# Altium PCB IoT_SYNTHPATCH.PcbDoc (part 2 of 3)
Units mm, origin at the board's own origin, x right, y up, seen from the top; angles counter-clockwise.
Board outline 109 x 108 mm, 6 copper layers (Top Layer, PWR, GND, SIG_MID, GND2, Bottom Layer), stack 1.82 mm thick; 198 components, 158 nets, 695 pads, 418 vias.
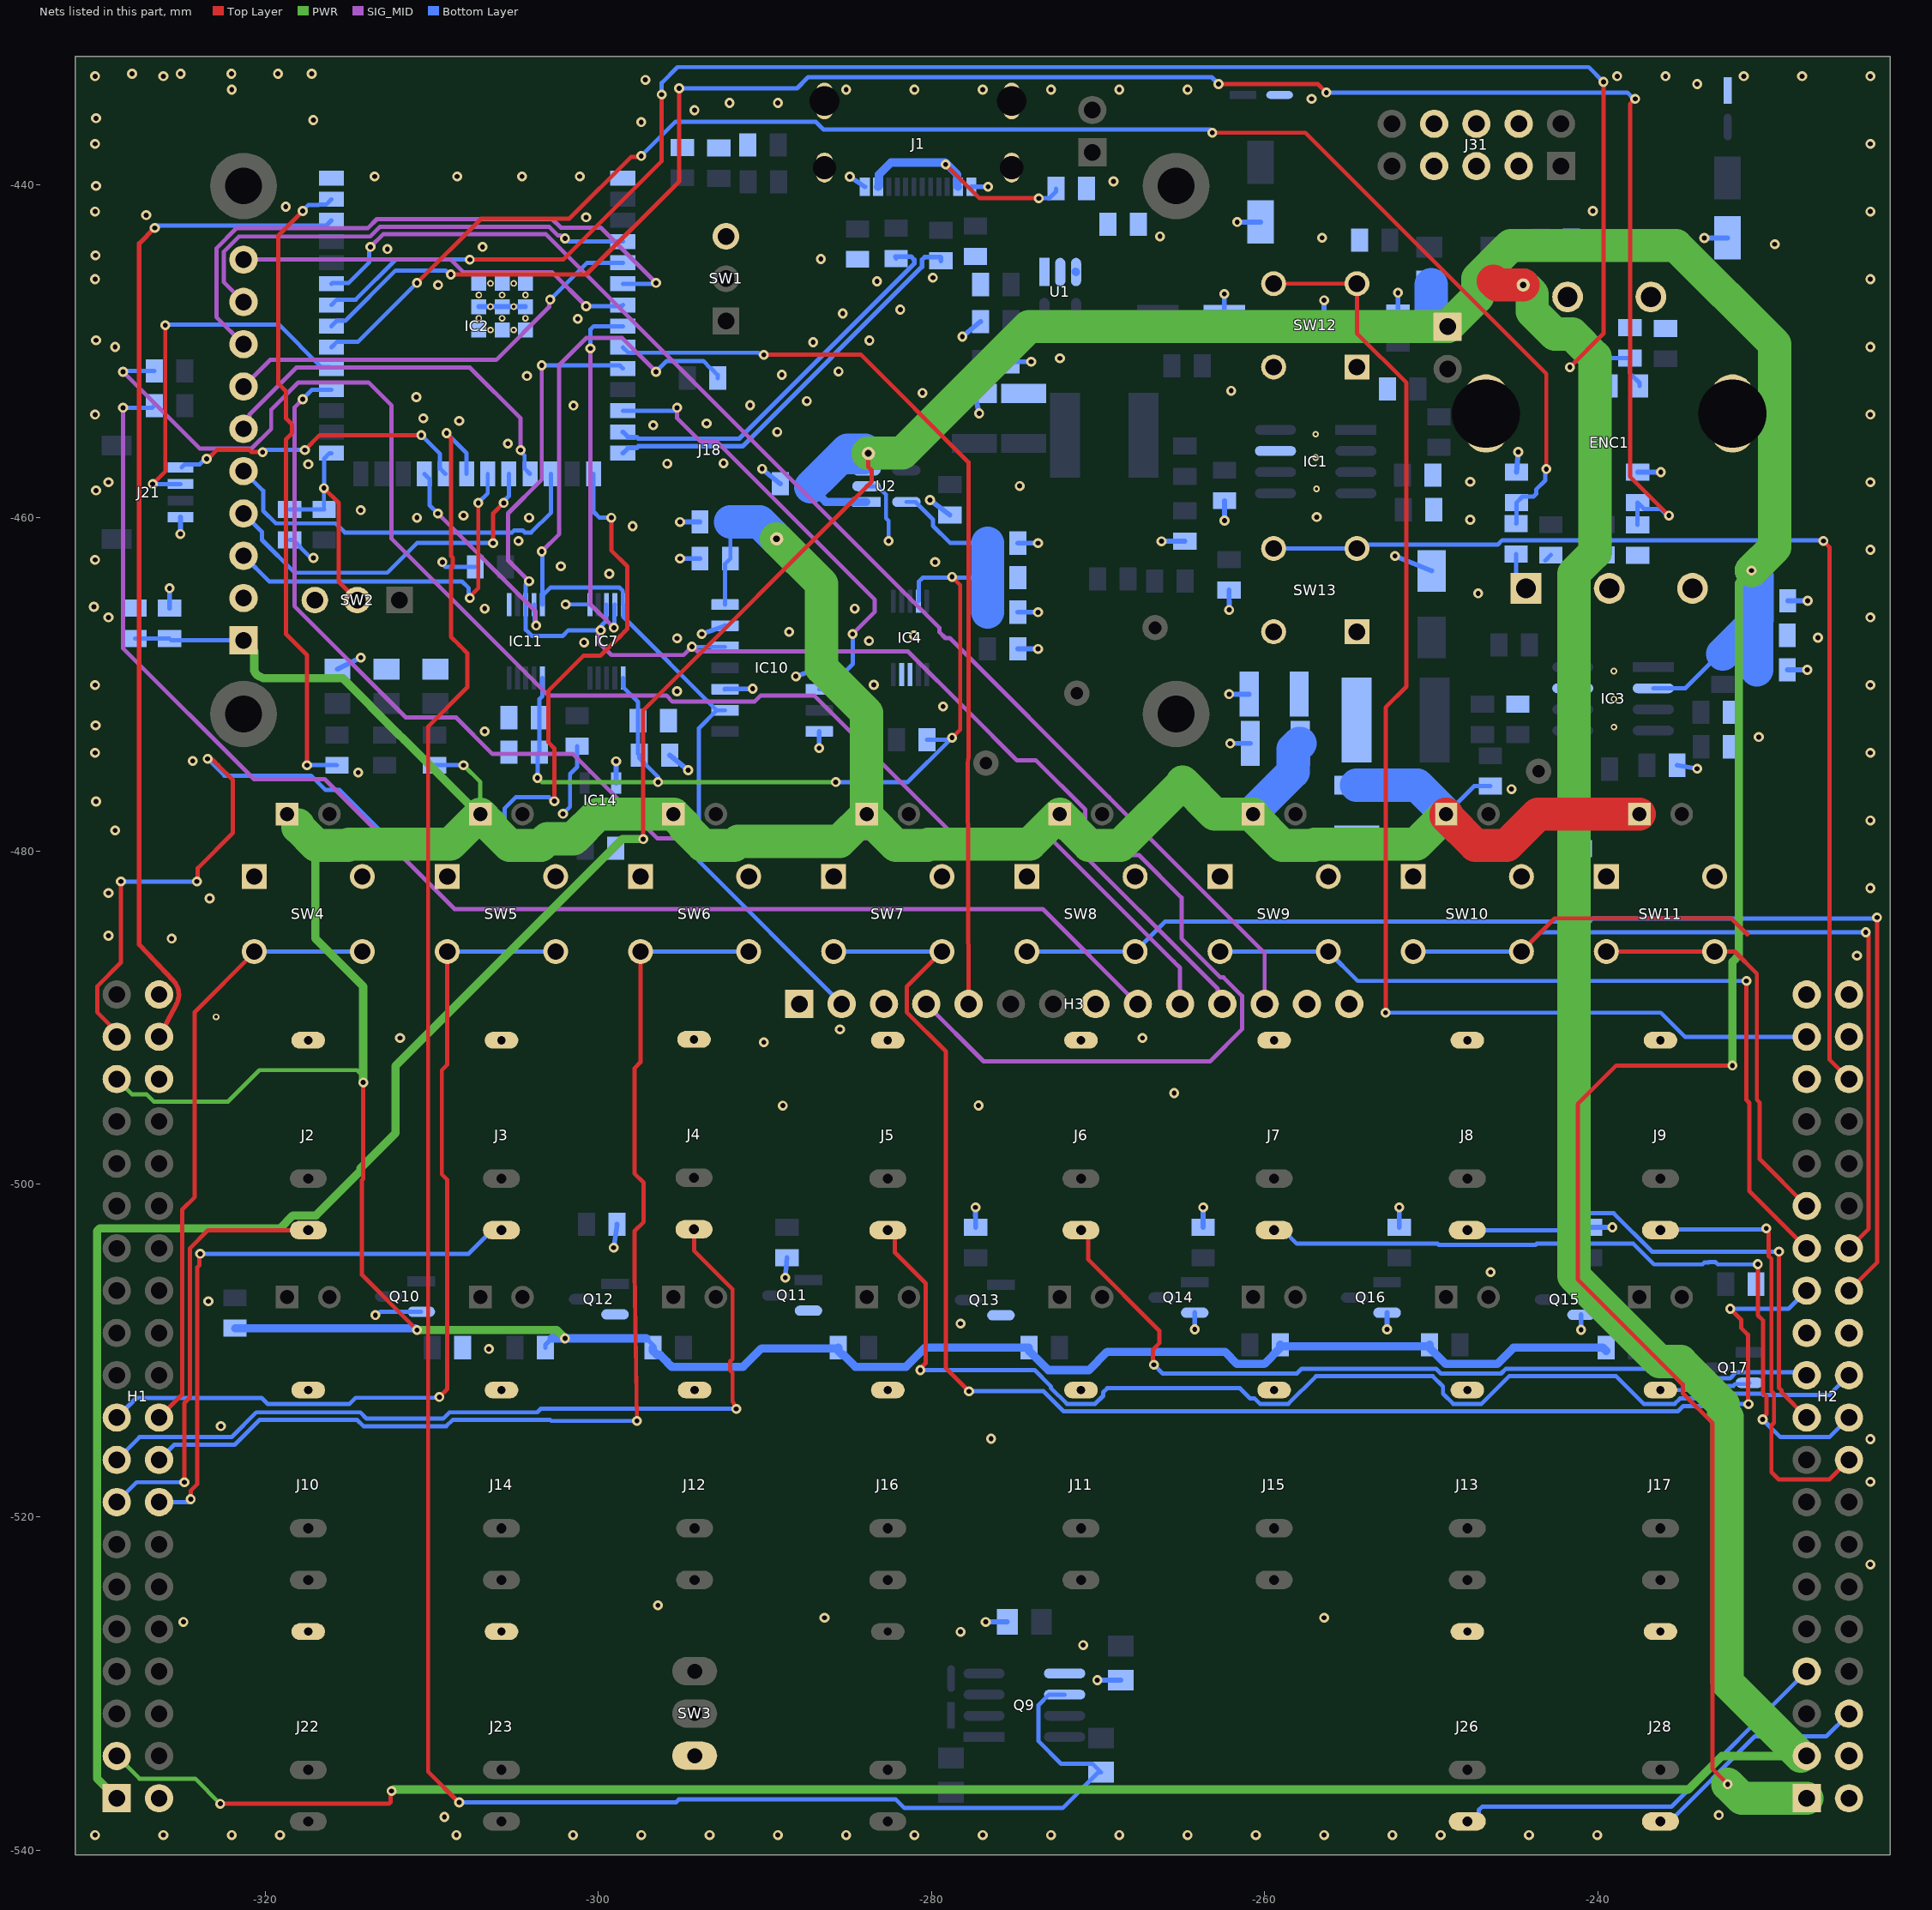
[diagram p6: the nets of this part, all layers, seen from the top]

## Via types
v1: diameter 0.6, hole 0.3, Top Layer to Bottom Layer, 407 vias
v2: diameter 0.4, hole 0.2, Top Layer to Bottom Layer, 7 vias
v3: diameter 0.8, hole 0.4, Top Layer to Bottom Layer, 4 vias

## Nets (pads, with @x,y where several pads share a name; then routed paths per layer and width w, separated by ;. In a path a pad name is that pad's centre, name@x,y a point inside that pad or via, vN(x,y) a via of type N, cw(c..) or ccw(c..) an arc to the next point about the centre after c; other vN are vias at no path point) (continued)
+5: C22.2 C23.2 C24.2 C62.2 C63.2 C88.2 C89.2 DS4.1 DS5.1 DS6.1 DS7.1 DS8.1 DS9.1 DS10.1 DS11.1 H1.35 IC10.14 J18.1 L2.2 R10.1 R16.1 R92.1 R93.1 R98.1 R99.1 R104.1 R105.1 R110.1 R111.1 | length 305
  Top Layer w0.254: v1(-314.123,-493.903) -314.123,-499.691 -314.198,-499.766 -314.198,-505.46 v1(-310.896,-508.762)
  Top Layer w2: DS10.1@-249.093,-477.791 -249.093,-477.908 -247.331,-479.67 -245.458,-479.67 -243.579,-477.791 DS11.1@-237.493,-477.791
  PWR w0.254: H1.35@-328.923,-493.701 -328.014,-494.61 -327.139,-494.61 -326.703,-495.046 -322.24,-495.046 -320.358,-493.164 -314.488,-493.164 -314.189,-493.462 ; J18.1@-321.31,-467.36 J18.1@-320.667,-468.003 ; DS4.1@-318.693,-477.791 -318.032,-478.452 -317.973,-478.511 ; -312.031,-472.954 -312.031,-472.853 ; -311.664,-473.321 -311.563,-473.321 ; v1(-308.102,-474.853) -307.093,-475.862 DS5.1@-307.093,-477.791
  PWR w0.5: J18.1@-320.667,-468.003 -320.667,-469.06 -320.667,-469.192 -320.602,-469.306 ccw(c-320.167,-469.06) -320.363,-469.52 cw(c-321.31,-471.78) -320.121,-469.638 -315.347,-469.638 -312.031,-472.954 -311.664,-473.321 -307.194,-477.791 DS5.1@-307.093,-477.791 ; -316.814,-479.67 -316.997,-479.853 -316.997,-485.262 -314.123,-488.136 -314.123,-493.462 v1(-314.123,-493.903) ; v1(-310.896,-508.762) -302.514,-508.762 v1(-302.006,-509.27)
  PWR w2: -318.032,-478.452 -318.032,-478.569 -316.931,-479.67 -316.814,-479.67 -315.058,-479.67 -314.98,-479.592 -308.894,-479.592 DS5.1@-307.093,-477.791 -306.432,-478.452 -306.432,-478.569 -305.331,-479.67 -303.458,-479.67 -303.062,-479.274 -301.512,-479.274 -300.029,-477.791 DS6.1@-295.493,-477.791 -294.832,-478.452 -294.832,-478.569 -293.731,-479.67 -291.858,-479.67 -291.613,-479.425 -285.527,-479.425 DS7.1@-283.893,-477.791 ; v3(-289.306,-461.264) -286.6,-463.97 -286.6,-469.013 -283.893,-471.719 DS7.1@-283.893,-477.791 ; DS10.1@-249.093,-477.791 -250.894,-479.592 -256.98,-479.592 -257.058,-479.67 -258.931,-479.67 -260.693,-477.908 DS9.1@-260.693,-477.791 -263,-477.791 -264.922,-475.869 -264.922,-475.934 -268.658,-479.67 -270.531,-479.67 -271.632,-478.569 -271.632,-478.452 DS8.1@-272.293,-477.791 -274.094,-479.592 -280.18,-479.592 -280.258,-479.67 -282.131,-479.67 -283.893,-477.908 DS7.1@-283.893,-477.791
  Bottom Layer w0.254: C89.2@-327.829,-467.257 C88.2@-325.755,-467.257 -325.652,-467.36 J18.1@-321.31,-467.36 ; v1@-310.999,-508.659 v1(-310.896,-508.762) ; R10.1@-309.837,-474.859 -309.831,-474.853 v1(-308.102,-474.853) ; R98.1@-303.184,-509.825 -303.184,-509.656 R98.1@-302.798,-509.27 ; R93.1@-297.114,-509.27 -296.728,-509.656 R93.1@-296.728,-509.825 ; IC10.14@-292.393,-465.211 -292.393,-462.765 C63.2@-292.076,-462.449 C62.2@-292.076,-460.248 ; R104.1@-274.148,-510.012 R104.1@-274.148,-509.825 ; DS10.1@-249.093,-477.791 -247.417,-476.115 R16.1@-246.438,-476.115
  Bottom Layer w0.5: R92.1@-321.818,-508.659 v1@-310.999,-508.659 ; R98.1@-302.798,-509.27 v1(-302.006,-509.27) R93.1@-297.114,-509.27 ; R93.1@-296.728,-509.825 -296.728,-510.012 -296.466,-510.275 -296.278,-510.275 -295.866,-510.687 -295.866,-510.711 -295.602,-510.975 -291.306,-510.975 -290.197,-509.866 -285.644,-509.866 R99.1@-285.603,-509.825 -285.603,-510.012 -285.341,-510.275 -285.267,-510.275 -284.567,-510.975 -281.536,-510.975 -280.386,-509.825 R104.1@-274.148,-509.825 ; R104.1@-274.148,-510.012 -272.985,-511.175 -270.547,-511.175 -269.445,-510.073 -262.379,-510.073 -261.651,-510.801 -260.019,-510.801 -259.056,-509.838 R110.1@-259.056,-509.651 -258.97,-509.738 -250.173,-509.738 R105.1@-250.086,-509.651 -250.086,-509.838 -249.124,-510.801 -246.032,-510.801 -245.056,-509.825 -239.678,-509.825 R111.1@-239.49,-510.012
  Bottom Layer w2: C62.2@-292.076,-460.248 -290.322,-460.248 v3(-289.306,-461.264) ; DS9.1@-260.693,-477.791 -260.693,-477.674 -258.285,-475.266 -258.285,-473.897 -257.935,-473.547 C23.2@-257.86,-473.547 ; C24.2@-254.465,-476.053 -250.831,-476.053 DS10.1@-249.093,-477.791
+5_USB: C2.2 C3.2 J1.A4-B9 J1.B4-A9 U1.1 U1.3 | length 15.7
  Top Layer w0.254: v1(-279.146,-438.785) -277.114,-440.817 v1(-273.558,-440.817)
  Bottom Layer w0.254: v1(-273.558,-440.817) -273.11,-440.817 -273.099,-440.806 -272.911,-440.806 -272.526,-440.42 C3.2@-272.526,-440.233
  Bottom Layer w0.5: J1.A4-B9@-283.205,-440.126 -283.155,-440.076 -283.155,-439.389 -282.437,-438.672 v1@-279.172,-438.672 ; J1.B4-A9@-278.405,-440.126 -278.455,-440.076 -278.455,-439.389 ; U1.3@-271.342,-445.222 U1.3@-271.32,-445.244 ; v1@-279.172,-438.672 -278.455,-439.389 ; v1@-279.172,-438.672 -278.455,-439.389
+5A: C28.2 C29.2 C37.2 C38.2 C41.2 C42.2 C91.2 IC4.9 IC7.1 IC11.1 R19.2 U2.5 | length 66.5
  Top Layer w0.254: v1(-278.765,-473.202) -278.276,-472.713 -278.276,-464.039 v1(-278.765,-463.55)
  PWR w0.254: v1(-303.657,-475.615) -303.403,-475.869 v1(-296.418,-475.869) v1(-285.75,-475.869)
  Bottom Layer w0.254: v1(-303.657,-475.615) -303.657,-474.181 C41.2@-303.55,-474.074 -303.538,-474.062 C42.2@-303.538,-472 -303.538,-470.884 -303.364,-470.71 IC11.1@-303.364,-469.616 ; IC7.1@-298.514,-469.616 -298.514,-470.166 -297.619,-471.061 C37.2@-297.619,-472.177 -297.619,-474.172 C38.2@-297.54,-474.251 -297.54,-474.439 -296.418,-475.561 v1(-296.418,-475.869) ; v1(-285.75,-475.869) -281.432,-475.869 v1@-278.892,-473.329 ; U2.5@-281.507,-459.048 -280.962,-459.048 -279.917,-460.093 -279.917,-460.477 -278.876,-461.518 C91.2@-276.63,-461.518 ; IC4.9@-280.787,-465.015 -280.764,-464.992 -280.764,-464.18 -280.764,-463.835 -280.521,-463.592 -278.765,-463.592 C28.2@-276.63,-463.592 ; R19.2@-280.265,-473.329 v1@-278.892,-473.329 ; v1(-278.765,-473.202) v1@-278.892,-473.329
  Bottom Layer w2: C29.2@-276.63,-465.667 C28.2@-276.63,-463.592 C91.2@-276.63,-461.518
+12: C19.2 C20.2 C21.2 C90.2 FB2.1 H1.1 H2.1 IC3.2 J24.1 R14.2 R116.1 U2.1 U2.3 | length 306.2
  Top Layer w0.254: v1(-297.307,-479.291) -297.307,-471.553 -283.591,-457.837 -283.591,-457.158 -283.791,-456.958 v3(-283.791,-456.13) ; v1(-232.184,-536.039) -233.096,-535.127 -233.096,-514.356 -234.888,-512.564 -234.888,-512.027 -241.195,-505.72 -241.195,-495.2 -238.881,-492.887 v1(-231.902,-492.887)
  PWR w0.5: H1.1@-328.923,-536.881 -330.1,-535.704 -330.1,-502.815 -329.951,-502.666 -319.118,-502.666 -318.342,-501.89 -316.96,-501.89 -314.296,-499.226 -314.296,-499.061 -312.19,-496.955 -312.19,-492.911 -298.57,-479.291 v1(-297.307,-479.291) ; v1(-231.902,-492.887) -231.902,-486.666 -231.521,-486.285 -231.521,-463.931 v1(-230.759,-463.169)
  PWR w2: v3(-283.791,-456.13) -283.779,-456.118 -281.747,-456.118 -274.15,-448.521 J24.1@-249.004,-448.521 -247.195,-446.712 -247.195,-445.633 -245.211,-443.649 -235.293,-443.649 -229.362,-449.58 -229.362,-461.772 v1(-230.759,-463.169) ; v1(-232.184,-536.039) -231.342,-536.881 H2.1@-227.443,-536.881
  Bottom Layer w0.254: R116.1@-298.967,-479.839 -298.967,-479.677 -298.582,-479.291 v1(-297.307,-479.291) ; IC3.2@-236.656,-470.238 -234.734,-470.238 -232.666,-468.17 R14.2@-232.479,-468.17
  Bottom Layer w0.5: C90.2@-287.25,-458.15 -286.352,-459.048 U2.1@-283.909,-459.048 ; C90.2@-287.25,-457.774 -286.624,-457.148 U2.3@-283.909,-457.148
  Bottom Layer w2: C90.2@-287.25,-458.15 -286.436,-457.336 -285.031,-455.93 -283.991,-455.93 v3(-283.791,-456.13) ; FB2.1@-250,-446.001 -250,-447.524 J24.1@-249.004,-448.521 ; R14.2@-232.479,-468.17 -230.409,-466.101 ; v1(-230.759,-463.169) -230.409,-463.519 C21.2@-230.409,-464.98 -230.409,-466.101 ; C19.2@-230.435,-469.134 -230.435,-466.126 -230.409,-466.101
-12: FB1.1 H1.3 H2.3 | length 205.6
  Top Layer w0.254: v1(-322.707,-537.21) -312.569,-537.21 -312.486,-537.127 -312.486,-536.514 v1(-312.42,-536.448)
  Top Layer w2: -246.259,-445.799 -246.034,-446.024 v3(-244.475,-446.024)
  PWR w0.254: H1.3@-328.923,-534.341 -327.56,-535.704 -324.213,-535.704 v1(-322.707,-537.21)
  PWR w0.5: v1(-312.42,-536.448) -312.393,-536.448 -312.3,-536.355 -234.551,-536.355 -232.537,-534.341 -227.803,-534.341 H2.3@-227.443,-534.341
  PWR w2: v3(-244.475,-446.024) -243.926,-446.573 -243.926,-447.616 -242.566,-448.977 -241.522,-448.977 -240.162,-450.337 -240.162,-462.092 -241.426,-463.356 -241.426,-505.515 -236.274,-510.667 -235.013,-510.667 -232.442,-513.238 -232.442,-513.775 -232.223,-513.994 -232.223,-529.921 H2.3@-227.803,-534.341
  Bottom Layer w0.254: FB1.1@-246.259,-445.799 -244.848,-445.799 -244.623,-446.024 v3(-244.475,-446.024)
BOOT: C15.2 IC2.27 R76.1 SW2.2 | length 13.3
  Top Layer w0.254: v1(-316.484,-458.216) -315.595,-459.105 -315.595,-463.832 SW2.2@-314.485,-464.942
  Bottom Layer w0.254: C15.2@-318.54,-459.492 R76.1@-316.469,-459.492 ; v1(-316.484,-458.216) -316.484,-459.478 R76.1@-316.466,-459.496 ; v1@-316.466,-458.234 -316.466,-456.438 -316.143,-456.115 IC2.27@-316.034,-456.115
D0_L: H1.20 SW4.3 SW4.4 | length 36.8
  Top Layer w0.254: H1.20@-326.383,-514.021 -324.993,-512.631 -324.993,-501.531 -324.239,-500.777 -324.239,-489.677 -320.673,-486.111 SW4.3@-320.673,-486.041
  Bottom Layer w0.254: SW4.3@-320.673,-486.041 SW4.4@-314.173,-486.041
D0_M: H2.37 SW12.3 SW12.4 | length 76.4
  Top Layer w0.254: SW12.4@-259.454,-445.945 SW12.3@-254.454,-445.945 -254.454,-448.921 -251.476,-451.899 -251.476,-470.132 -252.73,-471.386 v1(-252.73,-489.712)
  Bottom Layer w0.254: v1(-252.73,-489.712) -236.203,-489.712 -234.754,-491.161 H2.37@-227.443,-491.161
D1_L: H1.19 SW5.3 SW5.4 | length 53.9
  Top Layer w0.254: v1(-309.553,-512.787) -309.553,-512.783 -309.073,-512.304 -309.073,-499.746 -309.404,-499.414 -309.404,-493.168 -309.073,-492.837 SW5.3@-309.073,-486.041
  Bottom Layer w0.254: H1.19@-328.923,-514.021 -327.746,-512.844 -320.225,-512.844 -319.867,-513.202 -314.947,-513.202 -314.579,-512.834 -309.599,-512.834 v1(-309.553,-512.787) ; SW5.3@-309.073,-486.041 SW5.4@-302.573,-486.041
D1_M: H2.36 SW13.3 SW13.4 | length 66.2
  Top Layer w0.254: v1(-226.441,-461.391) -226.08,-461.752 -226.08,-492.524 H2.36@-224.903,-493.701
  Bottom Layer w0.254: SW13.4@-259.454,-461.845 SW13.3@-254.454,-461.845 -254.219,-461.61 -245.99,-461.61 -245.724,-461.345 -226.487,-461.345 v1(-226.441,-461.391)
D2_L: H1.18 SW6.3 SW6.4 | length 65.3
  Top Layer w0.254: v1(-297.688,-514.223) -297.84,-505.19 -297.84,-505.186 -297.84,-502.834 -297.281,-502.275 -297.281,-499.92 -297.84,-499.362 -297.84,-493.053 -297.473,-492.686 SW6.3@-297.473,-486.041
  Bottom Layer w0.254: H1.18@-326.383,-516.561 -325.474,-515.652 -321.846,-515.652 -320.358,-514.164 -314.488,-514.164 -314.11,-514.542 -309.136,-514.542 -308.758,-514.164 -302.888,-514.164 -302.829,-514.223 v1(-297.688,-514.223) ; SW6.3@-297.473,-486.041 SW6.4@-290.973,-486.041
D3_L: H2.25 SW7.3 SW7.4 | length 94
  Top Layer w0.254: SW7.4@-279.373,-486.041 -281.49,-488.158 -281.49,-489.679 -279.136,-492.033 -279.136,-511.058 v1(-277.749,-512.445) ; v1(-232.029,-507.492) -231.386,-508.135 -231.386,-508.641 -231.14,-508.887 -230.967,-509.06 -230.967,-513.189 v1(-230.942,-513.213)
  Bottom Layer w0.254: SW7.3@-285.873,-486.041 SW7.4@-279.373,-486.041 ; v1(-277.749,-512.445) -273.27,-512.445 -272.059,-513.656 -235.187,-513.656 -234.865,-513.334 -231.75,-513.334 -231.629,-513.213 v1(-230.942,-513.213) ; v1(-232.029,-507.492) -228.534,-507.492 H2.25@-227.443,-506.401
D4_L: H2.26 SW8.3 SW8.4 | length 75
  Top Layer w0.254: H2.26@-224.903,-506.401 -223.223,-504.72 v1(-223.223,-483.997)
  Bottom Layer w0.254: SW8.3@-274.273,-486.041 SW8.4@-267.773,-486.041 -265.983,-484.251 -240.489,-484.251 -240.295,-484.057 -223.283,-484.057 v1(-223.223,-483.997)
D5_L: H2.27 SW9.3 SW9.4 | length 49.9
  Top Layer w0.254: v1(-231.063,-487.807) -231.063,-494.956 -230.886,-495.133 -230.886,-500.418 H2.27@-227.443,-503.861
  Bottom Layer w0.254: SW9.3@-262.673,-486.041 SW9.4@-256.173,-486.041 -254.407,-487.807 v1(-231.063,-487.807)
D6_L: H2.28 SW10.3 SW10.4 | length 62
  Top Layer w0.254: SW10.4@-244.573,-486.041 -242.58,-484.048 -231.974,-484.048 -231.013,-485.008 -230.999,-484.994 ; H2.28@-224.903,-503.861 -223.726,-502.684 -223.726,-485.061 v1(-223.901,-484.886)
  Bottom Layer w0.254: SW10.3@-251.073,-486.041 SW10.4@-244.573,-486.041 -243.418,-484.886 v1(-223.901,-484.886)
D7_L: H2.29 SW11.3 SW11.4 | length 24.8
  Top Layer w0.254: SW11.3@-239.473,-486.041 SW11.4@-232.973,-486.041 -231.765,-486.041 -230.436,-487.37 -230.436,-494.941 -230.259,-495.118 -230.259,-498.505 H2.29@-227.443,-501.321
D_N: IC2.13 R78.1 | length 23.6
  Bottom Layer w0.28: IC2.13@-298.534,-454.845 -298.224,-455.155 -297.7,-455.155 -297.605,-455.25 -291.541,-455.25 -281.035,-444.744 -281.035,-444.512 -281.23,-444.317 -282.176,-444.317 R78.1@-282.125,-444.429
D_P: IC2.14 R77.1 | length 24.4
  Bottom Layer w0.28: IC2.14@-298.534,-456.115 -298.224,-455.805 -297.7,-455.805 -297.605,-455.71 -291.35,-455.71 -280.575,-444.935 -280.575,-444.512 -280.411,-444.348 -279.465,-444.348 R77.1@-279.433,-444.38
  Bottom Layer w0.3: R77.1@-279.433,-444.569 R77.1@-279.433,-444.38
ENC_A: ENC1.A R117.1 R119.2 | length 2.8
  Bottom Layer w0.254: R119.2@-244.889,-462.184 -244.889,-463.648 ENC1.A@-244.301,-464.236 ; R117.1@-243.144,-462.568 R117.1@-242.815,-462.239
ENC_B: ENC1.B R121.1 R122.2
ENC_SW: ENC1.E R118.1 R120.2
GATE_J2: H1.15 J2.1 | length 26.3
  Top Layer w0.254: v1(-324.866,-517.906) -324.866,-513.146 -324.539,-512.819 -324.539,-503.865 -323.445,-502.771 J2.1@-317.423,-502.771
  Bottom Layer w0.254: H1.15@-328.923,-519.101 -327.728,-517.906 v1(-324.866,-517.906) ; J2.1@-317.434,-502.782 J2.1@-317.423,-502.771
GATE_J3: H1.16 J3.1 | length 35.6
  Top Layer w0.254: v1(-324.485,-518.922) -324.485,-518.412 -324.085,-518.012 -324.085,-504.998 -323.958,-504.871 -323.958,-504.236 v1(-323.912,-504.19)
  Bottom Layer w0.254: H1.16@-326.383,-519.101 -324.664,-519.101 v1(-324.485,-518.922) ; v1(-323.912,-504.19) -307.796,-504.19 -306.377,-502.771 J3.1@-305.823,-502.771
GATE_J4: H1.17 J4.1 | length 50.7
  Top Layer w0.254: J4.1@-294.259,-502.718 -294.259,-504.004 -291.947,-506.316 -291.947,-510.516 -292.092,-510.661 -292.092,-511.181 -291.947,-511.326 -291.947,-513.03 v1(-291.723,-513.499)
  Bottom Layer w0.254: H1.17@-328.923,-516.561 -327.56,-515.198 -322.034,-515.198 -320.547,-513.71 -314.299,-513.71 -313.921,-514.088 -309.325,-514.088 -308.946,-513.71 -303.677,-513.71 -303.466,-513.499 v1(-291.723,-513.499)
GATE_J5: H2.22 J5.1 | length 70.9
  Top Layer w0.254: J5.1@-282.623,-502.771 -282.59,-502.771 -282.196,-503.166 -282.196,-504.117 -280.347,-505.966 -280.347,-510.752 -280.673,-511.078 v1(-280.673,-511.172)
  Bottom Layer w0.254: v1(-280.673,-511.172) -273.804,-511.172 -272.838,-512.139 -272.838,-512.236 -271.871,-513.202 -270.175,-513.202 -269.688,-512.715 -269.688,-512.501 -269.451,-512.264 -261.472,-512.264 -260.856,-512.88 -260.593,-512.88 -260.271,-513.202 -258.575,-513.202 -256.913,-511.54 -249.894,-511.54 -249.283,-512.151 -249.283,-512.591 -248.671,-513.202 -246.975,-513.202 -245.313,-511.54 -238.887,-511.54 -237.225,-513.202 -235.375,-513.202 -235.053,-512.88 -233.984,-512.88 -233.691,-512.586 -230.117,-512.586 -230.045,-512.658 -226.08,-512.658 H2.22@-224.903,-511.481
GATE_J6: H2.21 J6.1 | length 50.5
  Top Layer w0.254: J6.1@-271.023,-502.771 -270.99,-502.771 -270.596,-503.166 -270.596,-504.525 -266.319,-508.802 -266.319,-509.561 -266.7,-509.942 -266.7,-510.794 v1(-266.642,-510.852)
  Bottom Layer w0.254: v1(-266.642,-510.852) -266.116,-511.378 -258.057,-511.378 -257.765,-511.086 -249.706,-511.086 -249.414,-511.378 -245.793,-511.378 -245.501,-511.086 -235.829,-511.086 -235.252,-511.662 -232.033,-511.662 -231.667,-511.297 -227.628,-511.297 H2.21@-227.443,-511.481
GATE_J7: H2.20 J7.1 | length 45.8
  Top Layer w0.254: v1(-230.378,-504.812) -230.378,-507.875 -230.059,-508.194 -230.059,-512.568 -229.861,-512.766 -229.861,-513.812 -230.088,-514.039 v1(-230.088,-514.132)
  Bottom Layer w0.254: J7.1@-259.423,-502.771 -258.869,-502.771 -258.055,-503.585 -249.605,-503.585 -249.537,-503.652 -243.728,-503.652 -243.661,-503.585 -237.851,-503.585 -236.611,-504.825 -233.704,-504.825 -233.585,-504.706 -233.324,-504.706 -233.301,-504.684 -232.925,-504.684 -232.784,-504.825 -230.391,-504.825 v1(-230.378,-504.812) ; v1(-230.088,-514.132) -229.022,-515.198 -226.08,-515.198 H2.20@-224.903,-514.021
GATE_J8: H2.19 J8.1 | length 31.5
  Top Layer w0.254: J8.1@-247.823,-502.771 -247.791,-502.771 J8.1@-247.396,-503.166 ; v1(-229.108,-504.063) -229.108,-512.235 -228.953,-512.39 -228.953,-512.511 H2.19@-227.443,-514.021
  Bottom Layer w0.254: J8.1@-247.823,-502.771 -241.918,-502.771 -241.584,-502.437 -241.584,-502.094 -241.251,-501.76 -239.034,-501.76 -236.731,-504.063 v1(-229.108,-504.063)
GATE_J9: H2.18 J9.1 | length 26.6
  Top Layer w0.254: v1(-229.87,-502.666) -229.87,-502.76 -229.735,-502.895 -229.735,-504.323 -229.562,-504.496 -229.562,-512.423 -229.407,-512.578 -229.407,-514.339 -229.562,-514.493 -229.562,-517.304 -229.128,-517.738 -226.08,-517.738 H2.18@-224.903,-516.561
  Bottom Layer w0.254: J9.1@-236.223,-502.771 -236.171,-502.718 -229.922,-502.718 v1(-229.87,-502.666)
GND: C2.1 C3.1 C4.1 C5.1 C6.1 C7.1 C8.1 C9.1 C10.1 C11.1 C13.1 C14.2 C15.1 C16.1 C17.1 C19.1 C20.1 C21.1 C22.1 C23.1 C24.1 C26.1 C27.1 C28.1 C29.1 C37.1 C38.1 C39.1 C40.1 C41.1 C42.1 C43.1 C61.1 C62.1 C63.1 C64.1 C65.1 C66.1 C82.2 C83.1 C84.1 C85.2 C86.2 C88.1 C89.1 C90.1 C91.1 C92.1 D1.2 D2.2 D14.1 D15.2 DS1.2 DS2.2 DS3.2 ENC1.1 ENC1.2 ENC1.C ENC1.D H1.2 H1.36 H1.40 H2.2 H2.4 H2.23 H2.24 H2.35 H2.38 H2.39 H2.40 H3.1 H3.3 H3.8 H3.13 H3.14 IC1.7 IC2.GND IC3.7 IC4.3 IC4.4 IC7.6 IC10.1 IC10.2 IC10.4 IC10.7 IC10.10 IC10.13 IC11.6 IC14.2 J1.1 J1.2 J1.3 J1.4 J1.A1-B12 J1.B1-A12 J2.3 J3.3 J4.3 J5.3 J6.3 J7.3 J8.3 J9.3 J10.3 J11.3 J12.3 J13.3 J14.3 J15.3 J16.3 J17.3 J18.2 J21.1 J22.3 J23.3 J26.3 J28.3 J31.3 J31.4 J31.5 J31.6 J31.7 J31.8 Q9.5 Q10.2 Q11.2 Q12.2 Q13.2 Q14.2 Q15.2 Q16.2 Q17.2 R5.1 R6.1 R8.1 R9.1 R13.1 R17.1 R18.1 R79.1 R91.1 R94.2 R95.2 R100.2 R101.2 R106.2 R107.2 R112.2 R113.2 SW1.3 SW2.3 SW3.3 SW4.1 SW4.2 SW5.1 SW5.2 SW6.1 SW6.2 SW7.1 SW7.2 SW8.1 SW8.2 SW9.1 SW9.2 SW10.1 SW10.2 SW11.1 SW11.2 SW12.1 SW12.2 SW13.1 SW13.2 U1.2 U2.2 | length 87.2
  Bottom Layer w0.254: C15.1@-318.54,-461.317 -318.353,-461.317 -317.329,-462.341 -317.177,-462.341 v1(-317.111,-462.407) ; v1(-313.397,-507.873) -313.303,-507.873 -313.099,-507.668 Q10.2@-310.64,-507.668 ; v1(-309.372,-462.661) -309.339,-462.694 -309.339,-462.799 -309.19,-462.948 C43.1@-307.396,-462.948 ; v1(-302.133,-477.774) -301.705,-477.346 -301.705,-475.385 -301.277,-474.957 C39.1@-301.277,-473.716 ; v1(-301.967,-465.201) -300.53,-465.201 IC7.6@-300.514,-465.216 ; U2.2@-283.909,-458.098 -283.265,-458.098 -282.992,-458.371 -282.962,-458.371 -282.728,-458.605 -282.728,-460.02 -282.575,-460.173 v1(-282.575,-461.391) ; J17.3@-236.223,-512.371 -234.117,-512.371 -233.863,-512.116 -231.845,-512.116 -231.737,-512.008 -230.957,-512.008 Q17.2@-230.886,-511.937
  Bottom Layer w0.3: C88.1@-325.755,-465.431 v1(-325.753,-464.231) ; v1(-325.103,-460.971) J21.1@-325.101,-459.97 ; DS3.2@-315.669,-469.09 v1(-314.273,-468.391) ; IC2.GND@-307.184,-447.325 IC2.GND@-304.384,-447.325 ; v1(-299.083,-503.821) R100.2@-298.878,-502.417 ; IC14.2@-298.933,-475.925 v1(-298.933,-474.621) ; C38.1@-295.715,-474.251 v1(-294.613,-475.151) ; v1(-295.103,-462.451) C63.1@-293.902,-462.449 ; v1(-295.103,-460.251) C62.1@-293.902,-460.248 ; v1(-293.793,-466.981) IC10.13@-292.393,-466.481 ; IC10.10@-292.393,-470.291 v1(-290.736,-470.263) ; v1(-290.173,-457.061) C90.1@-289.076,-457.962 ; v1(-288.783,-505.621) R95.2@-288.679,-504.424 ; v1(-288.143,-469.521) IC10.4@-286.743,-469.021 ; v1(-286.743,-473.831) IC10.7@-286.743,-472.831 ; v1(-284.903,-439.521) J1.A1-B12@-284.005,-440.126 ; v1(-280.093,-458.931) C92.1@-278.89,-459.829 ; v1(-278.143,-449.121) C5.1@-277.043,-448.216 ; J1.B1-A12@-277.605,-440.126 v1(-276.603,-440.121) ; C11.1@-277.43,-452.53 v1(-277.133,-453.731) ; v1(-277.353,-501.401) R101.2@-277.35,-502.599 ; v1(-276.743,-526.291) C40.1@-275.448,-526.291 ; C4.1@-275.218,-450.629 v1(-274.013,-450.631) ; C82.2@-274.804,-467.868 v1(-273.603,-467.871) ; C29.1@-274.804,-465.667 v1(-273.603,-465.671) ; C91.1@-274.804,-461.518 v1(-273.603,-461.521) ; v1(-270.043,-529.791) R91.1@-268.638,-529.79 ; v1(-266.183,-461.411) R13.1@-264.78,-461.408 ; v1(-264.193,-508.731) Q14.2@-264.193,-507.728 ; R106.2@-263.685,-502.599 v1(-263.683,-501.401) ; D1.2@-262.414,-448.056 v1(-262.413,-446.561) ; v1(-262.403,-460.171) C13.1@-262.4,-458.971 ; R5.1@-262.128,-464.335 v1(-262.123,-465.531) ; v1(-262.123,-470.591) C22.1@-260.918,-470.593 ; v1(-262.063,-473.551) C23.1@-260.86,-473.547 ; v1(-261.643,-442.241) C85.2@-260.241,-442.246 ; v1(-256.423,-446.941) C8.1@-256.419,-448.445 ; v1(-252.643,-508.731) Q16.2@-252.638,-507.729 ; v1(-252.163,-462.291) D2.2@-249.964,-463.187 ; C7.1@-251.986,-447.693 v1(-251.983,-446.491) ; v1(-251.913,-501.401) R112.2@-251.909,-502.599 ; C64.1@-244.862,-457.255 v1(-244.763,-456.051) ; v1(-240.993,-508.751) Q15.2@-240.991,-507.856 ; R107.2@-240.415,-502.599 v1(-239.113,-502.601) ; C66.1@-237.599,-457.26 v1(-236.203,-457.261) ; R79.1@-235.224,-474.857 v1(-234.023,-475.061) ; v1(-233.593,-443.201) C83.1@-232.193,-443.197 ; C19.1@-228.61,-469.134 v1(-227.413,-469.131) ; C21.1@-228.584,-464.98 v1(-227.383,-464.981)
  other v1: -330.223,-539.091 -326.123,-539.091 -322.023,-539.091 -319.123,-539.091 -308.523,-539.091 -301.523,-539.091 -297.423,-539.091 -293.323,-539.091 -289.223,-539.091 -285.123,-539.091 -281.023,-539.091 -276.923,-539.091 -272.823,-539.091 -268.723,-539.091 -264.623,-539.091 -260.523,-539.091 -256.423,-539.091 -252.323,-539.091 -249.423,-539.091 -244.123,-539.091 -240.023,-539.091 -309.251,-538.004 -232.723,-537.891 -270.891,-527.685 -278.257,-526.884 -324.923,-526.291 -286.423,-526.041 -256.423,-526.041 -296.423,-525.291 -223.623,-522.841 -223.623,-517.881 -223.623,-515.321 -276.423,-515.291 -322.673,-514.541 -306.578,-509.905 -278.257,-508.381 -323.423,-507.041 -246.423,-505.291 -288.925,-495.293 -277.173,-495.291 -265.43,-494.538 -290.068,-491.49 -311.912,-491.236 -267.335,-491.236 -285.496,-490.721 -224.423,-486.291 -325.628,-485.267 -329.423,-485.091 -323.342,-482.854 -329.423,-482.531 -223.623,-482.231 -329.023,-478.771 -223.623,-478.171 -330.167,-477.031 -245.173,-476.291 -314.423,-475.291 -324.358,-474.599 -330.223,-474.111 -223.623,-474.111 -230.322,-473.164 -306.832,-472.821 -330.192,-472.459 -279.306,-471.33 -295.283,-470.416 -330.223,-470.041 -223.623,-470.041 -283.464,-470.027 -300.863,-467.487 -283.751,-467.393 -295.275,-467.233 -226.766,-467.195 -281.059,-467.071 -288.544,-466.852 -329.423,-465.981 -223.623,-465.981 -306.832,-465.455 -284.607,-465.455 -330.294,-465.347 -247.173,-464.541 -299.35,-463.365 -302.26,-462.915 -279.781,-462.661 -330.223,-462.521 -223.623,-461.921 -304.8,-461.391 -297.942,-460.502 -247.65,-460.121 -310.896,-459.994 -304.165,-459.994 -256.865,-459.956 -308.102,-459.867 -314.275,-459.546 -330.167,-458.362 -274.701,-458.089 -329.423,-457.861 -223.623,-457.861 -247.65,-457.835 -317.423,-456.791 -295.867,-456.75 -292.489,-456.725 -305.435,-455.549 -289.263,-454.845 -296.705,-454.439 -293.505,-454.337 -308.362,-454.184 -310.515,-454.025 -330.223,-453.801 -223.623,-453.801 -301.498,-453.263 -290.888,-453.245 -287.485,-452.991 -310.935,-452.755 -280.543,-452.501 -262.001,-452.374 -304.292,-451.485 -288.983,-451.416 -285.58,-451.213 -272.288,-450.42 -329.023,-449.741 -223.623,-449.741 -287.104,-449.461 -330.167,-449.345 -283.726,-449.359 -301.244,-448.056 -285.326,-447.733 -281.871,-447.505 -309.626,-446.024 -283.268,-445.803 -330.223,-445.671 -223.623,-445.671 -279.917,-445.582 -286.639,-444.461 -330.2,-444.246 -312.674,-443.865 -306.959,-443.738 -229.362,-443.572 -256.54,-443.191 -266.28,-443.103 -300.736,-441.96 -327.152,-441.833 -330.223,-441.611 -223.623,-441.611 -240.284,-441.579 -318.77,-441.325 -330.167,-440.074 -269.074,-439.801 -313.436,-439.508 -308.483,-439.508 -304.585,-439.508 -301.117,-439.508 -330.223,-437.551 -223.623,-437.551 -297.434,-436.245 -317.119,-436.118 -330.167,-436.01 -294.232,-435.532 -292.123,-435.091 -289.223,-435.091 -257.175,-434.848 -322.023,-434.291 -285.123,-434.291 -281.023,-434.291 -276.923,-434.291 -272.823,-434.291 -268.723,-434.291 -264.623,-434.291 -234.022,-433.959 -297.18,-433.705 -330.223,-433.491 -326.123,-433.491 -238.823,-433.491 -235.923,-433.491 -231.223,-433.491 -227.723,-433.491 -223.623,-433.491 -328.008,-433.343 -325.087,-433.343 -322.039,-433.343 -319.245,-433.343 -317.213,-433.343
  other v2: -322.961,-489.966 -239.014,-472.567 -239.014,-470.887 -239.025,-469.207 -256.876,-458.266 -256.932,-456.38 -256.932,-454.983
IN_J26: H2.7 J26.1 | length 25
  Top Layer w0.254: J26.1@-248.34,-537.876 -247.946,-538.271 J26.1@-247.823,-538.271
  Bottom Layer w0.254: J26.1@-247.823,-538.271 -247.533,-538.271 -247.139,-537.876 -247.139,-537.587 -246.942,-537.39 -235.572,-537.39 H2.7@-227.443,-529.261
IN_J28: H2.6 J28.1 | length 14.6
  Top Layer w0.254: J28.1@-236.81,-538.271 J28.1@-236.223,-538.271
  Bottom Layer w0.254: J28.1@-236.223,-538.271 -235.669,-538.271 -230.562,-533.164 -226.266,-533.164 H2.6@-224.903,-531.801
IO1: IC2.39 R12.1 | length 38.7
  Top Layer w0.254: v1(-317.754,-441.579) -317.754,-441.586 -319.216,-443.048 -319.216,-451.95 -318.762,-452.404 -318.762,-454.035 -318.397,-454.4 -318.397,-454.92 -318.762,-455.285 -318.762,-466.98 -317.5,-468.242 v1(-317.5,-474.853)
  Bottom Layer w0.254: v1(-317.754,-441.579) -317.754,-441.548 -317.432,-441.226 -316.806,-441.226 -316.779,-441.198 -316.357,-441.198 IC2.39@-316.034,-440.875 ; v1(-317.5,-474.853) -315.71,-474.853 R12.1@-315.704,-474.859
IO2: H1.38 IC2.38 | length 62.4
  Top Layer w0.28: v1(-326.644,-442.595) -327.573,-443.524 -327.573,-485.632 -325.519,-487.803 ; H1.38@-326.383,-491.161 -325.332,-489.178 ; -325.519,-487.803 cw(c-326.383,-488.621) -325.332,-489.179 ; -325.519,-487.803 cw(c-326.383,-488.621) -325.332,-489.179
  Bottom Layer w0.28: v1(-326.644,-442.595) -326.504,-442.455 -316.344,-442.455 IC2.38@-316.034,-442.145
IO3: H1.37 IC2.15 | length 71.6
  Top Layer w0.254: H1.37@-328.923,-491.161 -328.923,-490.866 -330.1,-489.689 -330.1,-488.133 -328.676,-486.709 v1(-328.676,-481.838) ; v1(-324.112,-481.838) -324.058,-481.784 -324.058,-481.03 -321.953,-478.925 -321.953,-475.734 -322.834,-474.853 -323.149,-474.538 -323.403,-474.538 v1(-323.469,-474.472) ; v1(-302.641,-477.012) -302.641,-473.847 -303.014,-473.474 -303.014,-470.402 -300.901,-468.289 -299.89,-468.289 -298.826,-467.226 -298.81,-467.226 -298.442,-466.859 -298.442,-466.842 -298.269,-466.668 -298.269,-462.917 -299.228,-461.958 v1(-299.228,-459.994)
  Bottom Layer w0.254: v1(-328.676,-481.838) v1(-324.112,-481.838) ; v1(-323.469,-474.472) -322.461,-475.48 -317.254,-475.48 -316.403,-476.331 -315.548,-476.331 -313.082,-478.797 -306.279,-478.797 -305.624,-478.143 -305.624,-477.439 -304.97,-476.785 -302.962,-476.785 -302.735,-477.012 v1(-302.641,-477.012) ; IC2.15@-300.299,-457.365 -300.299,-459.631 -299.936,-459.994 v1(-299.228,-459.994)
IO4: IC2.4 J18.9 | length 28.5
  SIG_MID w0.254: J18.9@-321.31,-447.04 -322.487,-445.863 -322.487,-444.012 -321.586,-443.111 -313.705,-443.111 -313.116,-442.522 -302.961,-442.522 -302.442,-443.041 -302.289,-443.041 -302.1,-443.23 v1(-302.006,-443.23)
  Bottom Layer w0.254: v1(-302.006,-443.23) -301.821,-443.415 IC2.4@-298.534,-443.415
IO5: IC2.5 J18.7 | length 26.1
  SIG_MID w0.254: J18.7@-321.31,-452.12 -319.713,-450.523 -306.137,-450.523 -302.961,-447.348 -302.961,-446.969 v1(-302.895,-446.903)
  Bottom Layer w0.254: v1(-302.895,-446.903) -300.678,-444.685 IC2.5@-298.534,-444.685
IO6: IC2.6 J18.8 | length 37.2
  SIG_MID w0.254: J18.8@-321.31,-449.58 -322.941,-447.949 -322.941,-443.824 -321.72,-442.603 -313.839,-442.603 -313.304,-442.068 -302.773,-442.068 -302.254,-442.587 -299.855,-442.587 v1(-296.545,-445.897)
  Bottom Layer w0.254: IC2.6@-298.534,-445.955 -296.603,-445.955 v1(-296.545,-445.897)
IO7: IC2.7 J18.10 | length 24
  SIG_MID w0.254: J18.10@-321.31,-444.5 -308.866,-444.5 -308.096,-445.27 -302.76,-445.27 v1(-300.736,-447.294)
  Bottom Layer w0.254: v1(-300.736,-447.294) -298.603,-447.294 IC2.7@-298.534,-447.225
IO8: IC2.12 IC10.5 | length 27.4
  SIG_MID w0.254: v1(-295.275,-453.39) -295.275,-454.025 -293.878,-455.422 -292.905,-455.422 -283.403,-464.924 -283.403,-465.648 v1(-284.734,-466.979)
  Bottom Layer w0.254: IC2.12@-298.534,-453.575 -295.46,-453.575 v1(-295.275,-453.39) ; IC10.5@-286.743,-470.291 -286.243,-470.291 -284.724,-468.773 -284.724,-466.989 v1(-284.734,-466.979)
IO9: IC2.17 J18.5 | length 23.6
  Bottom Layer w0.254: J18.5@-321.31,-457.2 -320.133,-458.377 -320.133,-459.575 -319.373,-460.335 -315.777,-460.335 -315.229,-460.883 -305.179,-460.883 -305.06,-460.764 -304.54,-460.764 -304.421,-460.883 -304.038,-460.883 -302.839,-459.684 IC2.17@-302.839,-457.365
IO10: IC2.18 J18.6 | length 23.3
  SIG_MID w0.254: J18.6@-321.31,-454.66 -321.31,-454.269 -320.948,-453.906 -320.948,-453.79 -318.135,-450.977 -307.721,-450.977 -304.673,-454.025 v1(-304.673,-455.93)
  Bottom Layer w0.254: v1(-304.673,-455.93) -304.673,-456.024 -304.432,-456.264 -304.432,-457.042 IC2.18@-304.109,-457.365
IO11: IC2.19 J18.4 | length 22
  Top Layer w0.254: v1(-306.324,-461.518) -306.324,-459.74 v1(-305.689,-459.105)
  Bottom Layer w0.254: J18.4@-321.31,-459.74 -320.204,-460.846 -320.204,-461.328 -318.237,-463.296 -312.674,-463.296 -310.896,-461.518 v1(-306.324,-461.518) ; v1(-305.689,-459.105) -305.689,-459.011 -305.379,-458.702 IC2.19@-305.379,-457.365
IO12: IC2.20 J18.3 | length 22.8
  Top Layer w0.254: v1(-307.721,-464.82) -307.721,-464.741 -307.213,-464.233 v1(-307.213,-459.105)
  Bottom Layer w0.254: J18.3@-321.31,-462.28 -319.775,-463.815 -308.205,-463.815 -307.787,-464.232 -307.787,-464.754 v1(-307.721,-464.82) ; v1(-307.213,-459.105) -307.213,-459.09 -306.649,-458.526 IC2.20@-306.649,-457.365
IO13: IC2.21 Q9.6 R89.1 | length 135.8
  Top Layer w0.254: v1(-309.118,-454.914) -309.118,-454.968 -308.85,-455.236 -308.85,-462.296 -308.745,-462.401 -308.745,-462.921 -308.85,-463.026 -308.85,-467.155 -308.353,-467.652 -307.878,-468.127 -307.878,-470.184 -310.228,-472.534 -310.228,-535.285 -308.388,-537.125 v1(-308.357,-537.125)
  Bottom Layer w0.254: v1(-309.118,-454.914) -307.919,-456.113 IC2.21@-307.919,-457.365 ; v1(-308.357,-537.125) -295.335,-537.125 -295.167,-536.956 -282.138,-536.956 -281.623,-537.471 -272.128,-537.471 -269.974,-535.316 R89.1@-269.823,-535.316 -269.898,-535.241 -270.324,-534.816 -272.209,-534.816 -273.571,-533.454 -273.571,-531.279 -272.948,-530.656 Q9.6@-272.007,-530.656
IO14: IC2.22 J21.4 | length 18.2
  Top Layer w0.254: v1(-323.522,-456.464) -323.447,-456.464 -322.913,-455.93 -320.969,-455.93 -320.842,-456.057 -320.167,-456.057 v1(-320.161,-456.063) ; v1(-317.627,-455.93) -316.738,-455.041 v1(-310.642,-455.041)
  Bottom Layer w0.254: J21.4@-325.032,-456.974 -324.851,-456.793 -323.945,-456.793 -323.616,-456.464 v1(-323.522,-456.464) ; v1(-320.161,-456.063) -320.068,-456.063 -319.935,-455.93 v1(-317.627,-455.93) ; v1(-310.642,-455.041) -309.512,-456.171 -309.512,-457.042 IC2.22@-309.189,-457.365
IO15: IC2.8 IC7.9 | length 21.9
  SIG_MID w0.254: v1(-300.482,-449.834) -300.482,-465.201 -299.084,-466.599 v1(-299.069,-466.599)
  Bottom Layer w0.254: v1(-300.482,-449.834) -300.482,-448.691 -300.286,-448.495 IC2.8@-298.534,-448.495 ; v1(-299.069,-466.599) -299.037,-466.567 -299.037,-465.239 IC7.9@-299.014,-465.216
IO16: H3.5 IC2.9 | length 56.1
  Top Layer w0.254: v1(-290.068,-450.215) -284.228,-450.215 -277.847,-456.596 -277.773,-456.67 -277.773,-474.403 ccw(c-276.733,-474.726) -277.822,-474.73 H3.5@-277.773,-489.191
  Bottom Layer w0.254: IC2.9@-298.534,-449.765 -298.211,-450.088 -290.39,-450.088 -290.329,-450.149 -290.134,-450.149 v1(-290.068,-450.215)
IO17: H3.4 IC2.10 IC7.8 IC10.12 IC11.8 | length 104.5
  SIG_MID w0.254: v1(-304.165,-463.804) -305.427,-462.542 -305.427,-461.839 -305.435,-461.831 -305.435,-460.441 -305.427,-460.433 -305.427,-459.73 -303.403,-457.706 v1(-303.403,-450.85) ; v1(-299.863,-466.753) -299.863,-466.846 -300.04,-467.024 -300.04,-467.14 -300.053,-467.152 -300.053,-467.406 -299.218,-468.241 -294.886,-468.241 v1(-294.386,-467.741) -294.343,-467.741 -294.064,-468.02 -281.407,-468.02 -277.821,-471.606 -274.861,-474.566 -273.718,-474.566 -270.759,-477.525 -270.759,-478.208 -268.723,-480.244 -267.548,-480.244 -264.984,-482.808 -264.984,-485.252 -262.641,-487.595 -262.464,-487.595 -261.356,-488.703 -261.356,-490.718 -263.271,-492.633 -276.871,-492.633 H3.4@-280.313,-489.191
  Bottom Layer w0.254: v1(-304.165,-463.804) -304.364,-464.003 IC11.8@-304.364,-465.216 -304.364,-466.731 -303.997,-467.098 -302.149,-467.098 -301.804,-466.753 -300.023,-466.753 -299.974,-466.704 -299.974,-466.642 v1(-299.863,-466.753) ; v1(-303.403,-450.85) -298.72,-450.85 IC2.10@-298.534,-451.035 ; v1@-299.974,-466.631 -299.583,-466.24 -299.583,-466.226 -299.537,-466.18 -299.537,-465.239 IC7.8@-299.514,-465.216 ; v1(-294.386,-467.741) -294.376,-467.751 IC10.12@-292.393,-467.751
IO18: H3.2 IC7.10 IC10.9 IC11.10 R1.1 | length 63.4
  SIG_MID w0.254: v1(-303.403,-462.026) -302.357,-460.98 -302.357,-450.822 -300.742,-449.207 -298.569,-449.207 v1(-296.545,-451.231)
  Bottom Layer w0.254: v1(-303.403,-462.026) -303.364,-462.065 IC11.10@-303.364,-464.666 ; IC11.10@-303.364,-465.216 IC11.10@-303.364,-464.666 ; v1(-296.545,-451.231) -295.899,-450.585 -293.704,-450.585 -293.25,-451.039 -293.224,-451.039 -292.838,-451.424 R1.1@-292.838,-451.612 ; IC10.9@-292.393,-471.561 IC10.9@-292.893,-471.561 ; H3.2@-285.393,-489.191 -293.959,-480.625 -293.959,-472.628 IC10.9@-292.893,-471.561 ; IC11.10@-303.364,-464.666 -302.887,-464.189 -298.729,-464.189 -298.537,-464.381 -298.537,-465.193 IC7.10@-298.514,-465.216 -298.491,-465.239 -298.491,-465.963 IC10.9@-292.893,-471.561
IO21: IC2.23 IC11.9 | length 13.2
  SIG_MID w0.254: v1(-309.642,-459.74) -303.784,-465.598 -303.784,-466.424 v1(-303.737,-466.471)
  Bottom Layer w0.254: IC2.23@-310.459,-457.365 -310.136,-457.688 -310.136,-459.246 v1(-309.642,-459.74) ; IC11.9@-303.864,-465.216 -303.841,-465.239 -303.841,-466.273 -303.737,-466.377 v1(-303.737,-466.471)
IO35: H3.9 R20.1 | length 86.2
  SIG_MID w0.254: v1(-328.549,-453.39) -328.549,-467.832 -320.683,-475.698 -316.438,-475.698 -308.639,-483.497 -273.307,-483.497 H3.9@-267.613,-489.191
  Bottom Layer w0.254: v1(-328.549,-453.39) -326.795,-453.39 R20.1@-326.668,-453.263
IO36: H3.11 R21.1 | length 93
  SIG_MID w0.254: v1(-328.549,-451.231) -323.943,-455.837 -320.822,-455.837 -319.651,-454.666 -319.651,-453.511 -318.014,-451.874 -313.809,-451.874 -312.42,-453.263 -312.42,-461.264 -303.014,-470.67 -295.915,-470.67 -295.542,-471.043 -290.629,-471.043 -290.256,-470.67 -287.051,-470.67 -278.924,-478.797 -272.298,-478.797 -262.81,-488.285 -262.81,-488.914 H3.11@-262.533,-489.191
  Bottom Layer w0.254: v1(-328.549,-451.231) -328.507,-451.189 R21.1@-326.668,-451.189
IO37: H3.10 IC2.30 | length 78.9
  SIG_MID w0.254: v1(-317.754,-452.882) -318.254,-453.382 -318.254,-465.307 -311.572,-471.988 -308.551,-471.988 -306.358,-474.181 -301.53,-474.181 -296.46,-479.251 -272.843,-479.251 -265.449,-486.645 -265.073,-487.021 H3.10@-265.073,-489.191
  Bottom Layer w0.254: v1(-317.754,-452.882) -317.754,-452.872 -317.188,-452.305 IC2.30@-316.034,-452.305
IO38: IC2.31 J21.3 | length 22.5
  Top Layer w0.254: v1(-326.763,-457.97) -326.009,-457.216 v1(-326.009,-448.437)
  Bottom Layer w0.254: v1(-326.763,-457.97) J21.3@-325.101,-457.97 ; v1(-326.009,-448.437) -325.968,-448.396 -319.192,-448.396 -316.657,-450.931 IC2.31@-316.127,-450.943
IO39: C64.2 IC2.32 R119.1 | length 95
  Top Layer w0.254: v1(-310.896,-445.897) -307.04,-442.041 -301.747,-442.041 -298.05,-438.343 -297.5,-438.343 v1(-297.434,-438.277) ; v1(-263.137,-436.88) -257.556,-436.88 -243.078,-451.358 v1(-243.078,-457.073)
  Bottom Layer w0.254: IC2.32@-316.034,-449.765 -315.711,-449.442 -314.441,-449.442 v1(-310.896,-445.897) ; v1(-297.434,-438.277) -295.388,-436.231 -286.939,-436.231 -286.477,-436.693 -263.286,-436.693 -263.137,-436.842 v1(-263.137,-436.88) ; R119.1@-244.889,-460.359 -244.862,-460.333 C64.2@-244.862,-459.08 -244.511,-458.728 -243.844,-458.728 -243.689,-458.573 -243.689,-458.301 -243.144,-457.756 -243.144,-457.139 v1(-243.078,-457.073)
IO40: C66.2 IC2.33 R122.1 | length 118.2
  Top Layer w0.254: v1(-308.864,-445.389) -300.736,-445.389 -295.148,-439.801 v1(-295.148,-434.213) ; v1(-262.763,-433.959) -256.794,-433.959 v1(-256.286,-434.467) ; v1(-237.744,-434.843) -237.744,-434.856 -238.053,-435.165 -238.053,-457.526 v1(-235.712,-459.867)
  Bottom Layer w0.254: IC2.33@-316.034,-448.495 -315.711,-448.172 -315.203,-448.172 -312.179,-445.148 -309.186,-445.148 -308.945,-445.389 v1(-308.864,-445.389) ; v1(-295.148,-434.213) -288.074,-434.213 -287.409,-433.549 -263.173,-433.549 v1(-262.763,-433.959) ; v1(-256.286,-434.467) -238.213,-434.467 -237.838,-434.843 v1(-237.744,-434.843) ; R122.1@-237.599,-460.435 C66.2@-237.599,-459.085 -237.214,-459.471 -236.202,-459.471 -235.806,-459.867 v1(-235.712,-459.867)
IO41: C65.2 IC2.34 R120.1 | length 109.1
  Top Layer w0.254: v1(-307.721,-444.5) -302.112,-444.5 -296.199,-438.587 v1(-296.199,-434.586) ; v1(-241.662,-450.958) -239.649,-448.945 v1(-239.649,-433.832)
  Bottom Layer w0.254: IC2.34@-316.034,-447.225 -315.711,-446.902 -314.575,-446.902 -312.173,-444.5 v1(-307.721,-444.5) ; v1(-296.199,-434.586) -296.199,-433.889 -295.253,-432.943 -240.538,-432.943 v1(-239.649,-433.832) ; v1(-241.662,-450.958) -241.116,-450.412 R120.1@-238.059,-450.412 -238.059,-451.32 -237.478,-451.901 C65.2@-237.478,-452.088
IO42: H3.12 IC2.35 | length 78.9
  SIG_MID w0.254: v1(-313.69,-443.738) -312.928,-442.976 -303.149,-442.976 -279.53,-466.595 -279.53,-466.858 -279.163,-467.225 -278.9,-467.225 -269.34,-476.785 -269.336,-476.785 -268.747,-477.374 -268.747,-477.378 -259.993,-486.132 H3.12@-259.993,-489.191
  Bottom Layer w0.254: IC2.35@-316.034,-445.955 -315.976,-445.897 -314.995,-445.897 -313.756,-444.659 -313.756,-443.804 v1(-313.69,-443.738)